# Altium PCB U_I_Meter_TOP.PcbDoc
Units mm, origin at the board's own origin, x right, y up, seen from the top; angles counter-clockwise.
Board outline 67 x 84 mm, 2 copper layers (Top Layer, Bottom Layer), stack 1.071 mm thick; 136 components, 56 nets, 327 pads, 62 vias.
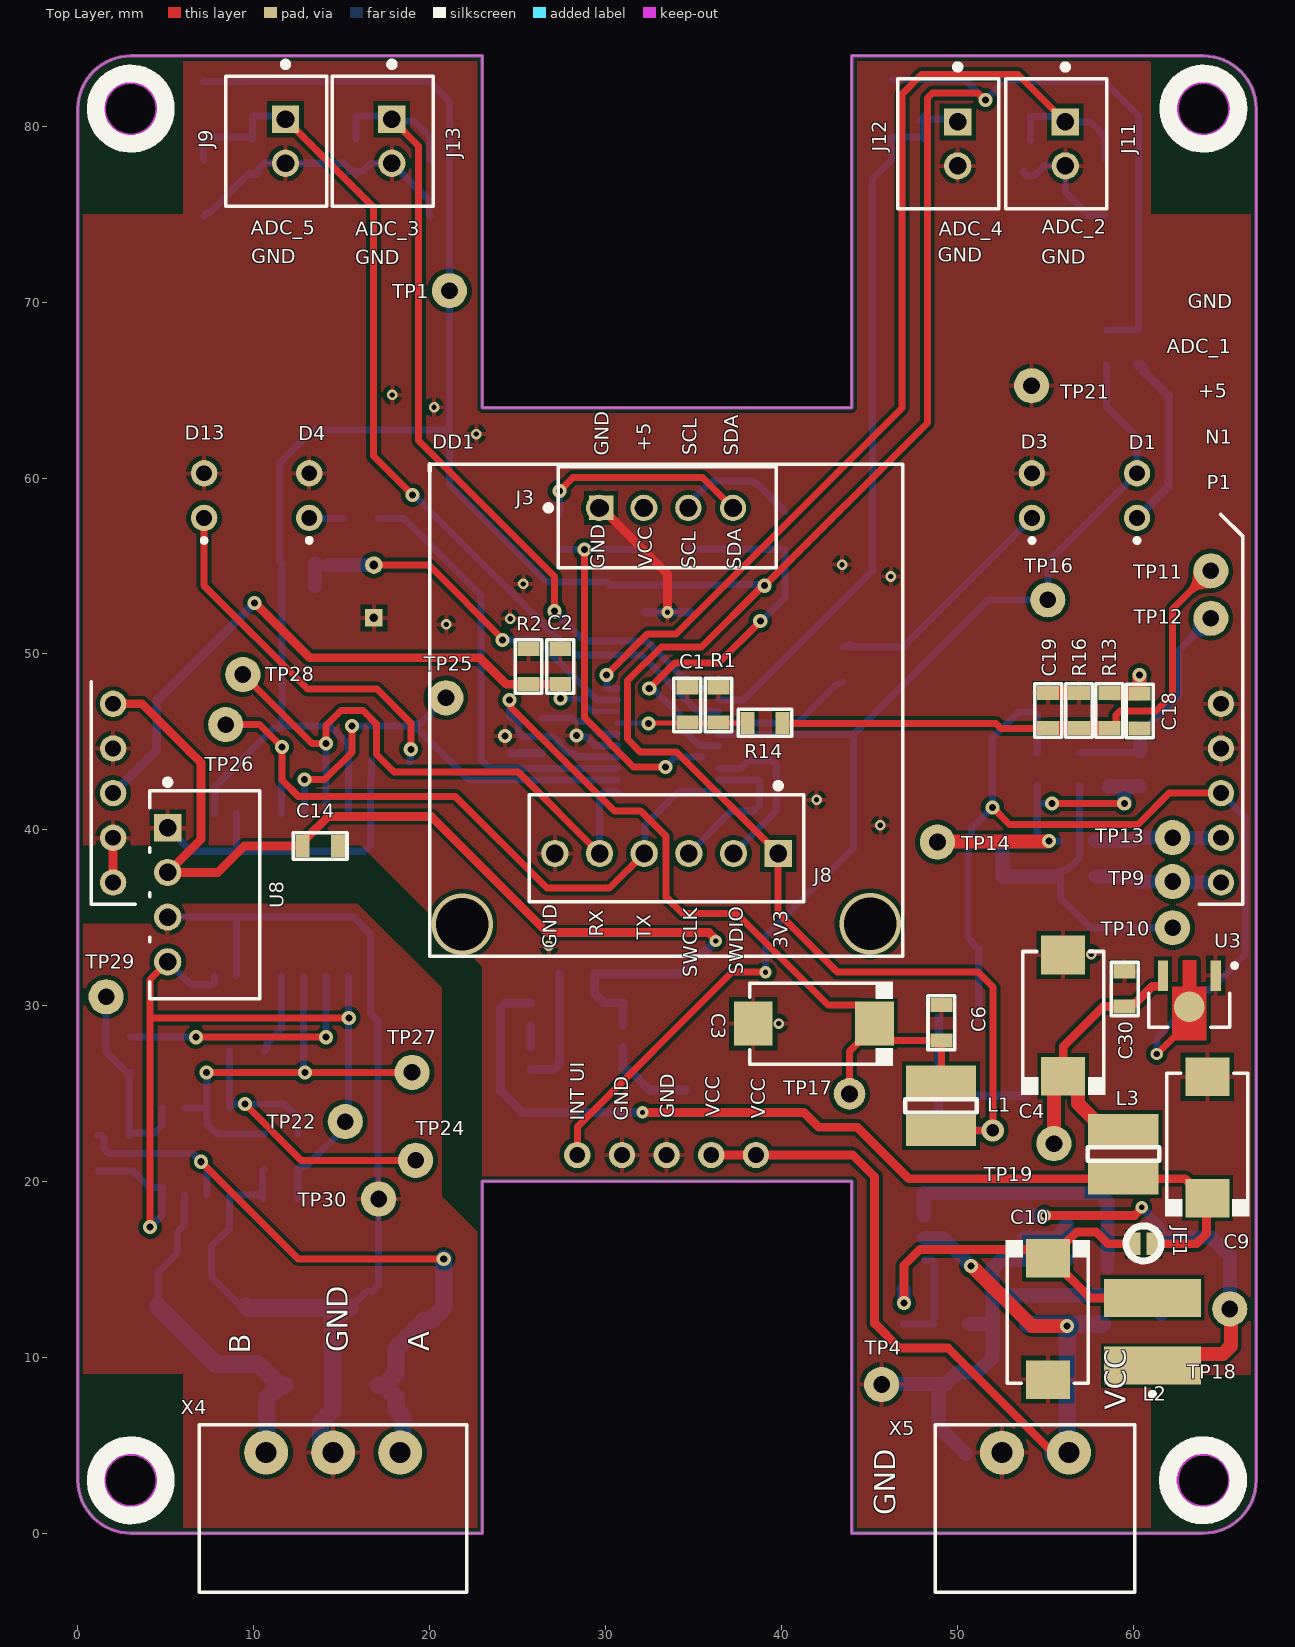
[diagram p0: Top Layer view]
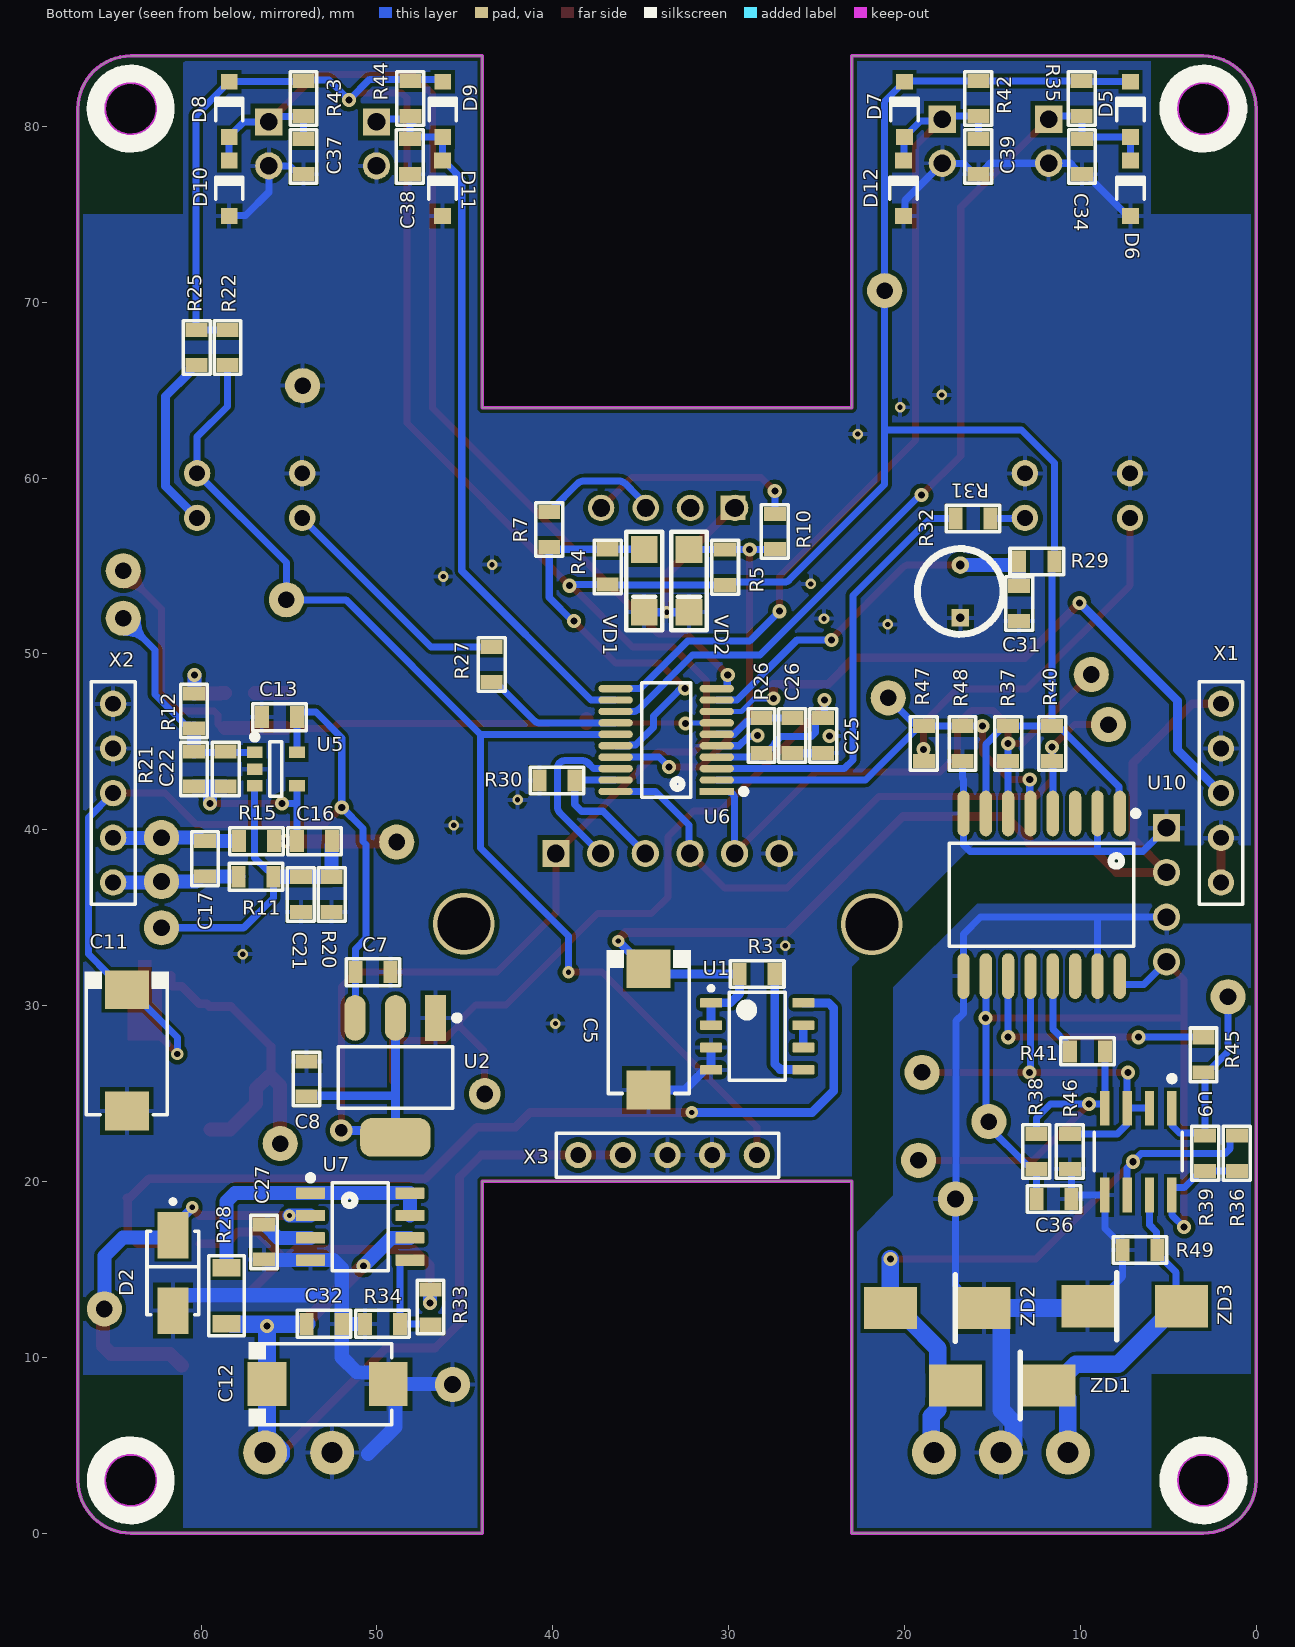
[diagram p1: Bottom Layer view, seen from below]
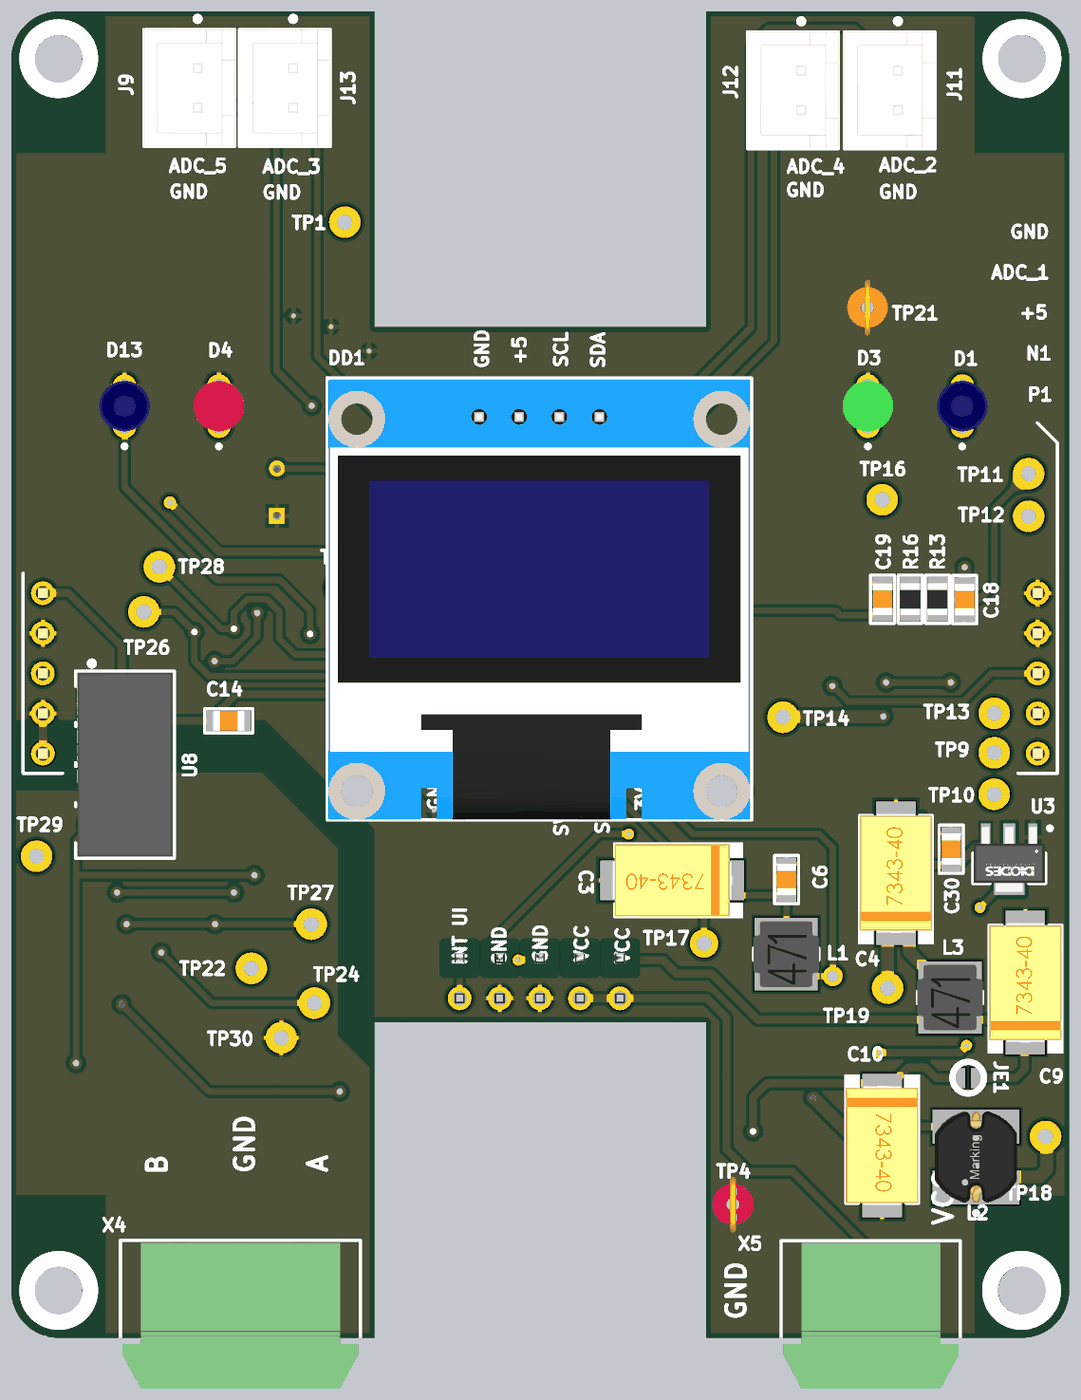
[diagram p2: 3D render of the assembled board from above, using the file's embedded part models]
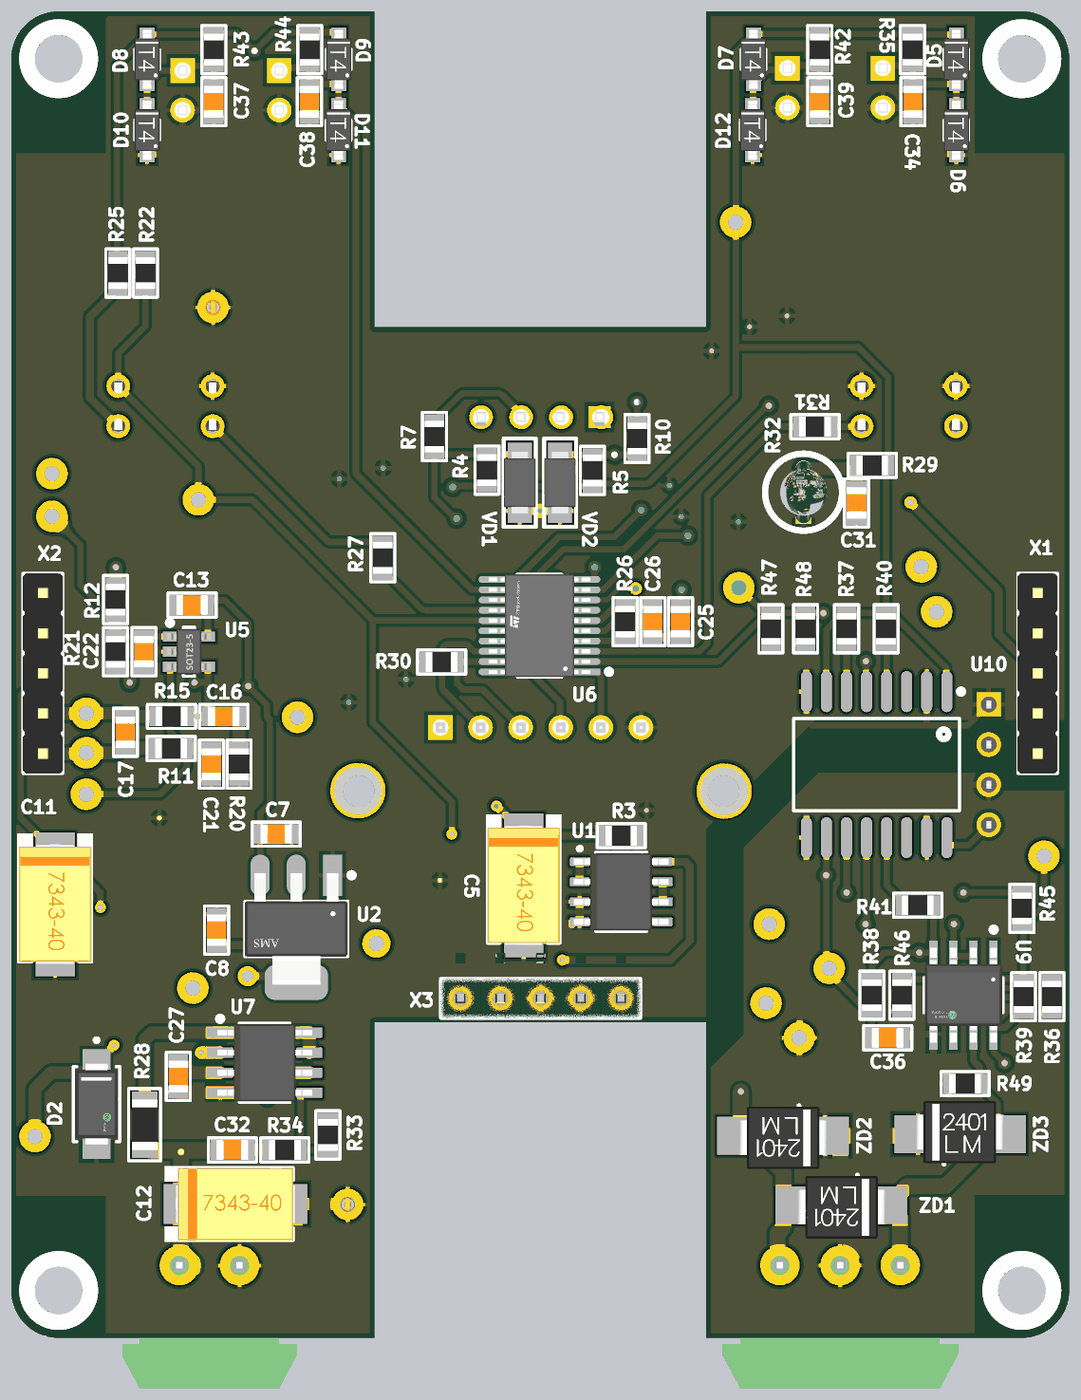
[diagram p3: 3D render of the assembled board from below, using the file's embedded part models]

## Layer stack, top to bottom
Top Solder: solder mask 0.0102, Solder Resist, Dk 3.5
Top Layer: signal copper 0.0356
Dielectric 1: dielectric 1, FR-4, Dk 4.8
Bottom Layer: signal copper 0.0356
Bottom Solder: solder mask 0.0102, Solder Resist, Dk 3.5

## Board outline
3,0 cw(c3,3) 0,3 0,81 cw(c3,81) 3,84 23,84 23,64 44,64 44,84 44.004,84 64,84 cw(c64,81) 67,81 67,3 cw(c64,3) 64,0 44,0 44,20 23,20 23,0
cut-out: 3,1.5 cw(c3,3) 1.5,3 cw(c3,3) 3,4.5 cw(c3,3) 4.5,3 cw(c3,3)
cut-out: 3,79.5 cw(c3,81) 1.5,81 cw(c3,81) 3,82.5 cw(c3,81) 4.5,81 cw(c3,81)
cut-out: 64,79.5 cw(c64,81) 62.5,81 cw(c64,81) 64,82.5 cw(c64,81) 65.5,81 cw(c64,81)
cut-out: 62.5,3 ccw(c64,3) 64,1.5 ccw(c64,3) 65.5,3 ccw(c64,3) 64,4.5 ccw(c64,3)

## Design rules (kind name [scope] priority, off if disabled: settings)
Clearance [All] p1: gap=0.2 ignorepadtopadclearanceinfootprint=FALSE except(0.254: THPad-THPad THPad-Via THPad-Fill THPad-Poly THPad-Region THPad-Text THPad-Hole Via-Via Via-Fill Via-Poly Via-Region Via-Text Via-Hole Fill-Fill Fill-Poly Fill-Region Fill-Text Fill-Hole Poly-Poly Poly-Region Poly-Text Poly-Hole Region-Region Region-Text Region-Hole Text-Text Text-Hole)
ComponentClearance [All] p1: gap=-1 collisioncheckmode=3 verticalgap=0 showdistances=FALSE
Height [All] p1: minheight=-1 maxheight=100 prefheight=12.7
PolygonConnect [All] p1: connectstyle=Relief reliefconductorwidth=0.254 reliefentries=4 polygonreliefangle="90 Angle" airgapwidth=0.254
RoutingVias [All] p1: holewidth=0.711 width=1.27 viastyle="Through Hole" minholewidth=0.711 minwidth=1.27 maxholewidth=0.711 maxwidth=1.27
SolderMaskExpansion [All] p1: expansion=0.102 istentingtop=FALSE
Width [All] p1: maxlimit=10 minlimit=0.254 preferedwidth=0.254 minimp=50.000000 maximp=50.000000 favimp=50.000000
28 further rules are at their usual default settings.

## Components (designator, comment, footprint, x,y, rotation, side; value= is the part's Value field where it differs from the comment)
C1 "1000pF" CAP-0805 34.65,47.1 r270 top
C2 "470nF" CAP-0805 27.425,49.275 r270 top
C3 "47uF_16V" CAP-TAN-D 41.85,28.975 r180 top
C4 "100uF_16V" CAP-TAN-D 56.025,29.425 r90 top
C5 "100uF_16V" CAP-TAN-D 34.55,28.65 r270 bottom
C6 "0.1uF" CAP-0805 49.1,29.025 r270 top
C7 "0.1uF" CAP-0805 50.225,31.9 r0 bottom
C8 "0.1uF" CAP-0805 54,25.825 r270 bottom
C9 "100uF_16V" CAP-TAN-D 64.225,22.5 r90 top
C10 "100uF_16V" CAP-TAN-D 55.15,12.175 r270 top
C11 "100uF_16V" CAP-TAN-D 64.225,27.45 r270 bottom
C12 "100uF_16V" CAP-TAN-D 52.8,8.475 r180 bottom locked
C13 "0.1uF" CAP-0805 55.55,46.4 r180 bottom
C14 "100nF" CAP-0805 13.775,39.075 r180 top
C16 "0.1uF" CAP-0805 53.55,39.35 r180 bottom
C17 "0.1uF" CAP-0805 59.775,38.35 r270 bottom
C18 "1000pF" CAP-0805 60.375,46.75 r90 top
C19 "1000pF" CAP-0805 55.175,46.775 r270 top
C21 "0.1uF" CAP-0805 54.325,36.325 r90 bottom
C22 "0.1uF" CAP-0805 58.6,43.45 r90 bottom
C25 "0.1uF" CAP-0805 24.625,45.35 r90 bottom
C26 "1uF" CAP-0805 26.375,45.35 r90 bottom
C27 "470pF" CAP-0805 56.425,16.55 r270 bottom
C30 "0.1uF" CAP-0805 59.525,30.95 r270 top
C31 "0.1uF" CAP-0805 13.475,52.875 r90 bottom
C32 "0.47uF" CAP-0805 53,11.9 r180 bottom
C34 "0.1uF" CAP-0805 9.9,78.275 r90 bottom
C36 "0.47uF" CAP-0805 11.5,19 r180 bottom
C37 "0.1uF" CAP-0805 54.175,78.275 r90 bottom
C38 "0.1uF" CAP-0805 48.125,78.275 r90 bottom
C39 "0.1uF" CAP-0805 15.8,78.275 r90 bottom
D1 "151031YS06000" LED_3mm_BLUE 60.225,59 r90 top
D2 "ES1G" FP-403AE-MFG 61.6,14.8 r270 bottom
D3 "151031YS06000" LED_3mm_GREEN 54.25,59 r90 top
D4 "151031YS06000" LED_3mm_RED 13.15,59 r90 top
D5 "1N4148" DIOD-SOD123-2_V 7.15,80.962 r90 bottom
D6 "1N4148" DIOD-SOD123-2_V 7.15,76.475 r90 bottom
D7 "1N4148" DIOD-SOD123-2_V 20,80.962 r90 bottom
D8 "1N4148" DIOD-SOD123-2_V 58.4,80.962 r90 bottom
D9 "1N4148" DIOD-SOD123-2_V 46.263,80.962 r90 bottom
D10 "1N4148" DIOD-SOD123-2_V 58.4,76.475 r90 bottom
D11 "1N4148" DIOD-SOD123-2_V 46.275,76.475 r90 bottom
D12 "1N4148" DIOD-SOD123-2_V 20.05,76.475 r90 bottom
D13 "LED" LED_3mm_BLUE 7.175,59 r90 top
DD1 "OLED_SSD_1306" OLED_128x64_SSD_1306 33.44,38.8 r0 top
J3 "B4B-XH-A(LF)(SN)" B4B-XH-A 33.5,57.775 r180 top locked
J8 "SWR25X-NRTC-S06-ST-BA" Sullins_SWR25X-NRTC-S06-ST-BA_MFG 33.47,38.95 r180 top locked
J9 "B2B-XH-A" B2B-XH-A 11.275,79.15 r270 top locked
J11 "B2B-XH-A" B2B-XH-A 55.625,79 r270 top locked
J12 "B2B-XH-A" B2B-XH-A 49.5,79 r270 top locked
J13 "B2B-XH-A" B2B-XH-A 17.325,79.15 r270 top locked
JE1 "Jumper" JE 60.6,16.475 r270 top
L1 "Coil" Coil_4.5x4.5_mm 49.075,24.3 r90 top
L2 "3.3µH, 4A" WE-PD2_5848 61.1,11.45 r90 top locked
L3 "Coil" Coil_4.5x4.5_mm 59.45,21.55 r90 top
R1 "10K" RES-0805 36.425,47.1 r90 top
R2 "43K" RES-0805 25.625,49.275 r270 top
R3 "300K" RES-0805 28.375,31.8 r180 bottom
R4 "10K" RES-0805 36.875,54.95 r270 bottom
R5 "10K" RES-0805 30.2,54.925 r270 bottom
R7 "10E" RES-0805 40.2,57.075 r90 bottom
R10 "10E" RES-0805 27.375,56.95 r90 bottom
R11 "10K" RES-0805 56.875,37.325 r180 bottom
R12 "10K" RES-0805 60.4,46.75 r270 bottom
R13 "10K" RES-0805 58.65,46.775 r90 top
R14 "10K" RES-0805 39.075,46.075 r0 top
R15 "10K" RES-0805 56.85,39.35 r180 bottom
R16 "100K*" RES-0805 56.925,46.775 r90 top
R20 "10K" RES-0805 52.575,36.325 r90 bottom
R21 "10K" RES-0805 60.4,43.45 r90 bottom
R22 "10K" RES-0805 58.5,67.425 r270 bottom
R25 "820" RES-0805 60.25,67.425 r90 bottom
R26 "10K" RES-0805 28.125,45.35 r90 bottom
R27 "220" RES-0805 43.475,49.4 r90 bottom
R28 "0.33" RES-1206 58.55,13.5 r90 bottom
R29 "10K" RES-0805 12.475,55.25 r0 bottom
R30 "10K" RES-0805 39.75,42.8 r0 bottom
R31 "220" RES-0805 16.1,57.7 r180 bottom
R32 "NTCLE413E2103F520L" FP-NTCLE413E2103F520L-MFG 16.825,53.55 r90 bottom
R33 "3.8K" RES-0805 46.95,12.85 r270 bottom
R34 "1.2K" RES-0805 49.675,11.9 r180 bottom
R35 "10K" RES-0805 9.925,81.575 r270 bottom
R36 "10K" RES-0805 1.1,21.6 r270 bottom
R37 "10K" RES-0805 14.1,44.9 r90 bottom
R38 "10K" RES-0805 12.5,21.7 r270 bottom
R39 "10K" RES-0805 2.9,21.6 r270 bottom
R40 "10K" RES-0805 11.6,44.9 r90 bottom
R41 "100" RES-0805 9.6,27.4 r0 bottom
R42 "10K" RES-0805 15.8,81.575 r270 bottom
R43 "10K" RES-0805 54.175,81.575 r270 bottom
R44 "10K" RES-0805 48.1,81.575 r270 bottom
R45 "100" RES-0805 3,27.2 r90 bottom
R46 "10K" RES-0805 10.6,21.7 r90 bottom
R47 "220" RES-0805 18.9,44.9 r90 bottom
R48 "10K" RES-0805 16.7,44.9 r90 bottom
R49 "10K" RES-0805 6.6,16.1 r180 bottom
TP1 "Test_Point_PCB" Test_Point#1 21.125,70.65 r270 top
TP4 "Test_Point_PCB" Pin_Test_Point(Pink) 45.7,8.45 r0 top
TP9 "Test_Point_PCB" Test_Point#2 62.375,37.05 r0 top
TP10 "Test_Point_PCB" Test_Point#3 62.375,34.425 r90 top
TP11 "Test_Point_PCB" Test_Point#4 64.325,54.725 r90 top
TP12 "Test_Point_PCB" Test_Point#1 64.425,52.025 r90 top
TP13 "Test_Point_PCB" Test_Point#1 62.25,39.55 r90 top
TP14 "Test_Point_PCB" Test_Point#1 48.875,39.3 r90 top
TP16 "Test_Point_PCB" Test_Point#1 55.15,53.075 r90 top
TP17 "" Test_Point#5 43.875,24.975 r90 top
TP18 "Test_Point_PCB" Test_Point#1 65.5,12.75 r90 top
TP19 "Test_Point_PCB" Test_Point#1 55.5,22.15 r90 top
TP21 "Test_Point_PCB" Pin_Test_Point(Orange) 54.225,65.25 r0 top
TP22 "Test_Point_PCB" Test_Point#1 15.2,23.4 r90 top
TP24 "Test_Point_PCB" Test_Point#1 19.2,21.2 r90 top
TP25 "Test_Point_PCB" Test_Point#1 20.925,47.5 r90 top
TP26 "Test_Point_PCB" Test_Point#1 8.4,45.975 r90 top
TP27 "Test_Point_PCB" Test_Point#1 19,26.2 r90 top
TP28 "Test_Point_PCB" Test_Point#1 9.375,48.825 r90 top
TP29 "" Test_Point#1 1.6,30.5 r90 top
TP30 "Test_Point_PCB" Test_Point#1 17.1,19 r90 top
U1 "LP2951-5.0" SOIC-8_L 28.375,28.25 r180 bottom
U2 "AMS1117-3.3" SOT-223 48.95,25.9 r0 bottom
U3 "AMS1117" SOT-89 63.2,29.925 r180 top
U5 "" SOT-23-5 55.75,43.45 r180 bottom
U6 "STM32G030F6P6" FP-TSSOP20-YA-IPC_A 33.55,45.1 r0 bottom locked
U7 "MC34063" SOIC-8_M 50.95,17.425 r180 bottom
U8 "B0505S-1W" B0505S-1W 7.2,36.3 r270 top
U9 "MAX485" SOIC-8-MFG 6.7,21.7 r270 bottom
U10 "ADUM1401BRWZ" ADI-RW-16_M 12.2,36.3 r270 bottom
VD1 "SMF3.3A" SMF3.3A 34.8,54.15 r0 bottom
VD2 "SMF3.3A" SMF3.3A 32.25,54.15 r0 bottom
X1 "CONN-5-PIN" CONN-PLS-5-2.54_2 2,37 r90 bottom locked
X2 "CONN-5-PIN" CONN-PLS-5-2.54_2 65,47.16 r270 bottom locked
X3 "CONN-5-PIN" CONN-PLS-5-2.54_2 28.395,21.5 r0 bottom locked
X4 "CONN-3-PIN" 691305340003 14.51,1.4 r0 top locked
X5 "CONN-2-PIN" 691305340002 54.45,1.4 r0 top locked
ZD1 "P6SMB16CA" DO-214AA 12.147,8.4 r0 bottom
ZD2 "P6SMB16CA" DO-214AA 15.847,12.8 r0 bottom
ZD3 "P6SMB16CA" DO-214AA 9.2,12.9 r180 bottom

## Footprints (in the part's own frame and the unit in brackets; to place one, negate y for a bottom-side part, rotate by r counter-clockwise, add the part's x,y. Pads: shape width x height; smd on the part's side, far side on the other; paste and mask are expansions set on the pad)
691305340002 [mm]
  round 2.5 hole 1.2: 1(-1.905,3.175) 2(1.905,3.183)
  silkscreen extent -5.7,-4.75 5.65,4.75, body extent -5.56,-4.6 5.56,4.6, height 7.3
691305340003 [mm]
  round 2.5 hole 1.2: 1(-3.81,3.183) 2(0,3.183) 3(3.81,3.183)
  silkscreen extent -7.6,-4.75 7.6,4.77, body extent -7.46,-4.6 7.46,4.6, height 7.3
ADI-RW-16_M [mm] "SOIC, 16-Leads, Body 10.3x7.5mm, Pitch 1.27mm, IPC Low Density"
  oval 2.6x0.7 smd: 1(-4.625,4.445) 2(-4.625,3.175) 3(-4.625,1.905) 4(-4.625,0.635) 5(-4.625,-0.635) 6(-4.625,-1.905) 7(-4.625,-3.175) 8(-4.625,-4.445) 9(4.625,-4.445) 10(4.625,-3.175) 11(4.625,-1.905) 12(4.625,-0.635) 13(4.625,0.635) 14(4.625,1.905) 15(4.625,3.175) 16(4.625,4.445)
  silkscreen extent -4.75,-5.25 2.93,5.47, body extent -3.8,-5.25 3.8,5.25, height 2.65
B2B-XH-A [mm]
  rect 1.55x1.55 hole 1 paste-2539.97 mask+0: 1(-1.25,0.525)
  round 1.55 hole 1 paste-2539.97 mask+0: 2(1.25,0.525)
  silkscreen extent -4.5,-2.88 3.7,2.88, body extent -3.8,-2.98 3.8,2.98, height 0.25
B4B-XH-A [mm]
  rect 1.4x1.4 hole 0.9 paste-2539.97 mask+0: 1(3.75,-0.525)
  round 1.4 hole 0.9 paste-2539.97 mask+0: 2(1.25,-0.525) 3(-1.25,-0.525) 4(-3.75,-0.525)
  silkscreen extent -6.2,-2.88 6.87,2.88, body extent -6.3,-2.98 6.3,2.98, height 0.25
B0505S-1W [mm]
  rect 1.55x1.55 hole 1 paste-2539.97 mask+0: 1(-3.81,-2.1)
  round 1.55 hole 1 paste-2539.97 mask+0: 2(-1.27,-2.1) 3(1.27,-2.1) 4(3.81,-2.1)
  silkscreen extent -6.52,-3.13 5.92,3.13, body extent -5.8,-3 5.8,3, height 10.41
CAP-0805 [mm]
  rect 0.8x1.25 smd mask+0.015: 1(-1,0) 2(1,0)
  silkscreen extent -1.52,-0.76 1.52,0.76, body extent -1,-0.62 1,0.63, height 0.8
CAP-TAN-D [mm]
  rect 2.2x2.5 smd: 1(-3.45,0) 2(3.45,0)
  silkscreen extent -4.5,-2.4 3.65,2.4, body extent -3.8,-2.3 3.8,2.3, height 4
Coil_4.5x4.5_mm [mm]
  rect 1.8x4 smd: 1(-1.397,0) 2(1.397,0)
  silkscreen extent -0.38,-2.03 0.38,2.03, body extent -2.07,-2.07 2.07,2.07, height 2.8
CONN-PLS-5-2.54_2 [mm]
  round 1.5 hole 0.9: 1(0,0) 2(2.54,0) 3(5.08,0) 4(7.62,0) 5(10.16,0)
  silkscreen extent -1.25,-1.25 11.41,1.25, body extent -1.27,-1.27 11.43,1.27, height 19.54
DIOD-SOD123-2_V [mm] "SOD123, 2-Leads, Body 2.7x1.55mm, Height 1.45mm"
  rect 0.9x0.95 smd: 1(1.575,0) 2(-1.575,0)
  silkscreen extent -0.64,-0.82 0.64,0.77, body extent -1.88,-0.8 1.88,0.8, height 1.3
DO-214AA [mm]
  rect 3x2.4 smd: 1(-0.381,0) 2(4.953,0)
  silkscreen extent 1.27,-1.91 1.27,1.91, body extent -0.53,-1.85 5.07,2.1, height 2.65
FP-403AE-MFG [mm]
  rect 2.65x1.75 smd paste+0 mask+0: 1(-2.15,0) 2(2.15,0)
  silkscreen extent -4.17,-1.48 2.37,1.48, body extent -2.6,-1.36 2.6,1.36, height 2.5
FP-NTCLE413E2103F520L-MFG [mm]
  rect 1x1 hole 0.5 paste-2539.97 mask+0: 1(-1.5,0)
  round 1 hole 0.5 paste-2539.97 mask+0: 2(1.5,0)
  silkscreen extent -2.44,-2.43 2.44,2.44, body extent -2,-1.49 2,1.49, height 55
FP-TSSOP20-YA-IPC_A [mm]
  rect 1.955x0.421 smd paste+0 mask+0: 1(-2.875,2.925)
  rrect100% 1.955x0.421 smd paste+0 mask+0: 2(-2.875,2.275) 3(-2.875,1.625) 4(-2.875,0.975) 5(-2.875,0.325) 6(-2.875,-0.325) 7(-2.875,-0.975) 8(-2.875,-1.625) 9(-2.875,-2.275) 10(-2.875,-2.925) 11(2.875,-2.925) 12(2.875,-2.275) 13(2.875,-1.625) 14(2.875,-0.975) 15(2.875,-0.325) 16(2.875,0.325) 17(2.875,0.975) 18(2.875,1.625) 19(2.875,2.275) 20(2.875,2.925)
  silkscreen extent -4.53,-3.25 1.4,3.25, body extent -3.21,-3.25 3.21,3.25, height 1.2
JE [mil]
  rect 50x27.56 smd: 1(1,20) 2(1,-21)
  silkscreen extent -39,-39 39,39
LED_3mm_BLUE [mm]
  round 1.5 hole 0.9: 1(-1.27,0) 2(1.27,0)
  silkscreen extent -2.6,-0.05 -2.5,0.05, body extent -1.6,-1.6 1.6,1.6, height 12.45
LED_3mm_GREEN [mm]
  round 1.5 hole 0.9: 1(-1.27,0) 2(1.27,0)
  silkscreen extent -2.6,-0.05 -2.5,0.05, body extent -1.6,-1.6 1.6,1.6, height 12.45
LED_3mm_RED [mm]
  round 1.5 hole 0.9: 1(-1.27,0) 2(1.27,0)
  silkscreen extent -2.6,-0.05 -2.5,0.05, body extent -1.6,-1.6 1.6,1.6, height 12.45
OLED_128x64_SSD_1306 [mm]
  round 1.5 hole 1: 1(-3.81,19.5) 2(-1.27,19.5) 3(1.27,19.5) 4(3.81,19.5)
  silkscreen extent -13.42,-6 13.45,21.98, body extent -13.35,-5.99 13.35,21.88, height 14.97
Pin_Test_Point(Orange) [mm]
  round 2 hole 0.95: 1(0,0)
  body extent -1.3,-1.78 1.3,1.78, height 6.93
Pin_Test_Point(Pink) [mm]
  round 2 hole 0.95: 1(0,0)
  body extent -1.3,-1.78 1.3,1.78, height 6.93
RES-0805 [mm]
  rect 0.8x1.25 smd mask+0.015: 1(-1,0) 2(1,0)
  silkscreen extent -1.52,-0.76 1.52,0.76, body extent -1,-0.62 1,0.63, height 0.6
RES-1206 [mm]
  rect 1x1.6 smd: 1(-1.6,0) 2(1.6,0)
  silkscreen extent -2.29,-1.02 2.29,1.02, body extent -1.6,-0.8 1.6,0.8, height 0.6
SMF3.3A [mil]
  rect 60x60 smd: 1(0,70) 2(0,-70)
  silkscreen extent -40,-110 40,110, body extent -39,-77 39,77, height 48
SOIC-8-MFG [mm]
  rect 1.98x0.53 smd paste+0 mask+0: 1(-2.465,1.905) 2(-2.465,0.635) 3(-2.465,-0.635) 4(-2.465,-1.905) 5(2.465,-1.905) 6(2.465,-0.635) 7(2.465,0.635) 8(2.465,1.905)
  silkscreen extent -4.27,-2.5 1.1,2.5, body extent -3,-2.45 3,2.45, height 1.75
SOIC-8_L [mm]
  rrect18% 1.25x0.55 smd: 1(-2.625,1.905) 2(-2.625,0.635) 3(-2.625,-0.635) 4(-2.625,-1.905) 5(2.625,-1.905) 6(2.625,-0.635) 7(2.625,0.635) 8(2.625,1.905)
  silkscreen extent -2.75,-2.5 1.6,2.85, body extent -3,-2.45 3,2.45, height 1.63
SOIC-8_M [mm]
  rrect15% 1.65x0.65 smd: 1(-2.825,1.905) 2(-2.825,0.635) 3(-2.825,-0.635) 4(-2.825,-1.905) 5(2.825,-1.905) 6(2.825,-0.635) 7(2.825,0.635) 8(2.825,1.905)
  silkscreen extent -2.95,-2.5 1.6,2.9, body extent -3,-2.45 3,2.45, height 1.63
SOT-23-5 [mm]
  rect 0.9x0.65 smd: 1(-1.2,0.95) 2(-1.2,0) 3(-1.2,-0.95) 4(1.2,-0.95) 5(1.2,0.95)
  silkscreen extent -1.33,-1.55 0.35,1.95, body extent -1.4,-1.45 1.4,1.45, height 1.24
SOT-89 [mm]
  rect 0.58x1.73 smd paste+0 mask+0: 1(-1.5,-1.781) 3(1.5,-1.781)
  round 1.74 smd paste+0 mask+0: 2(0,0)
  Top Layer region: -0.38,-2.646 -0.38,-1.146 -0.967,-1.146 -0.967,1.884 0.967,1.884 0.967,-1.146 0.38,-1.146 0.38,-2.646
  silkscreen extent -2.7,-2.47 2.3,1.15, body extent -2.4,-2.75 2.4,1.98, height 0.25
SOT-223 [mm]
  rect 1.2x2.6 smd paste+0 mask+0: 1(-2.29,-3.395)
  rrect100% 1.2x2.6 smd paste+0 mask+0: 2(0,-3.395) 3(2.29,-3.395)
  rrect59% 4x2.2 smd paste+0 mask+0: 2(0,3.395)
  silkscreen extent -3.62,-3.52 3.25,1.75, body extent -3.25,-3.53 3.25,3.53, height 1.8
Sullins_SWR25X-NRTC-S06-ST-BA_MFG [mm]
  rect 1.55x1.55 hole 1 paste-2539.97 mask+0: 1(-6.35,0.3)
  round 1.55 hole 1 paste-2539.97 mask+0: 2(-3.81,0.3) 3(-1.27,0.3) 4(1.27,0.3) 5(3.81,0.3) 6(6.35,0.3)
  silkscreen extent -7.8,-3.67 7.8,3.05, body extent -7.9,-3.15 7.9,3.15, height 0.25
Test_Point#1 [mm]
  round 2 hole 0.95: 1(0,0)
Test_Point#2 [mm]
  round 2 hole 0.95: 1(-0.125,0)
Test_Point#3 [mm]
  round 2 hole 0.95: 1(0,0.125)
Test_Point#4 [mm]
  round 2 hole 0.95: 1(0,-0.1)
Test_Point#5 [mm]
  round 1.8 hole 0.95: 1(0,0)
WE-PD2_5848 [mm] "SMD Power Inductor, 2-Leads, body 5.8x5.2mm"
  rect 2.15x5.5 smd: 1(-1.925,0) 2(1.925,0)
  silkscreen extent -3.67,-0.13 -3.43,0.12, body extent -2.9,-2.6 2.89,2.6, height 4.48

## Part data
C1 C2 C6 C7 C8 C13 C14 C16 C17 C18 C19 C21 C22 C25 C26 C27 C30 C31 C32 C34 C36 C37 C38 C39: library part CAP-NON-POLAR
C3: library part CAP-POLAR
C4 C5 C9 C10 C11 C12: library part CAP_POL_SMD
D1 D3 D4: library part LED, "WURTH ELEKTRONIK - 151031YS06000 - LED, Yellow, Through Hole, T-1 (3mm), 30 mA, 2 V, 590 nm", Manufacturer_Name="Wurth Elektronik", Mouser Part Number=710-151031YS06000, Datasheet Link=https://katalog.we-online.de/led/datasheet/151031YS06000.pdf, Geometry.Height=5.5mm, Manufacturer_Part_Number=151031YS06000, Mouser Price/Stock=https://www.mouser.co.uk/ProductDetail/Wurth-Elektronik/151031YS06000?qs=LlUlMxKIyB3xSYYW%252BcuBiQ%3D%3D
D2: "Ultrafast"
D13: "WURTH ELEKTRONIK - 151031YS06000 - LED, Yellow, Through Hole, T-1 (3mm), 30 mA, 2 V, 590 nm", Manufacturer_Name="Wurth Elektronik", Manufacturer_Part_Number=151031YS06000, Mouser Part Number=710-151031YS06000, Datasheet Link=https://katalog.we-online.de/led/datasheet/151031YS06000.pdf, Geometry.Height=5.5mm, Mouser Price/Stock=https://www.mouser.co.uk/ProductDetail/Wurth-Elektronik/151031YS06000?qs=LlUlMxKIyB3xSYYW%252BcuBiQ%3D%3D
JE1: library part JE
L2: library part 744774033, "WE-PD2 SMT Power Inductor, size 5848, 3.3µH, 4A, 0.06Ω", Case/Size Code=5848, DC Resistance=0.042Ω, DC Resistance Max=0.06Ω, Inductance=3.3µH, Manufacturer="Wurth Elektronik", Operating Temperature Max=125°C, Operating Temperature Min=-40°C, Rated Current=4A, Saturation Current=7.5A, Self Resonant Frequency=43MHz, Category="Unshielded Power Inductors", ComponentLink1Description="Website Link", ComponentLink1URL=https://www.we-online.com/redexpert/article/744774033?ad, ComponentLink2Description="Datasheet Link", ComponentLink2URL=https://www.we-online.com/redexpert/spec/744774033?ad, Height=4.5mm, Length=5.8mm, Manufacturer Part Number=744774033, Match Code=WE-PD2, Mount="Surface Mount", Packaging="Tape and Reel", Width=5.2mm, Simulation ModelName=5848_744774033_3.3u, Simulation ModelText=".subckt 5848_744774033_3.3u 1 2 / Rp 1 2 12000 / Cp 1 2 3.4p / Rs 1 N3 0.042 / L1 N3 2 3.3u / .ends 5848_744774033_3.3u", Simulation PortMap=(1:1),(2:2)
R1 R2 R3 R4 R5 R7 R10 R11 R12 R13 R14 R15 R16 R20 R21 R22 R26 R27 R28 R29 R30 R31 R34 R35 R36 R37 R38 R39 R40 R41 R42 R43 R44 R45 R46 R47 R48 R49: library part RES-CONST
R25: library part RES-CONST, "220"
R32: library part CMP-02404-000010-1, "THERMISTOR NTC 10KOHM 3435K BEAD", Max Operating Temperature=105°C, Max Power Dissipation=250mW, Min Operating Temperature=-40°C, Package Quantity=1000, Resistance=10kR, Resistance Tolerance=1%, Accuracy=1%, Lead Diameter=1mm, Mount="Through Hole", Number of Pins=2, Packaging=Bulk, Radiation Hardening=No, RoHS Compliant=Yes, Termination="Through Hole", Tolerance=1%
R33: library part RES-CONST, "10K"
TP1 TP4 TP9 TP10 TP11 TP12 TP13 TP14 TP16 TP17 TP18 TP19 TP21 TP22 TP24 TP25 TP26 TP27 TP28 TP29 TP30: library part TP_PCB?, "Test_Point"
U1: library part LP2951-3.3
U2: library part AMS1117
U5: library part MCP6001T, "IC OPAMP GP 1 CIRCUIT SOT23-5", Case/Package=SOT-23, Input Bias Current=1pA, Input Offset Voltage (Vos)=4.5mV, Max Operating Temperature=85°C, Max Supply Voltage=6V, Min Operating Temperature=-40°C, Min Supply Voltage=1.8V, Nominal Supply Current=100uA, Operating Supply Voltage=5.5V, Output Current=23mA, Package Quantity=1, Power Supply Rejection Ratio (PSRR)=86dB, Voltage Gain=112dB, Bandwidth=1MHz, Common Mode Rejection Ratio=60dB, Contact Plating=Tin, Gain Bandwidth Product=1MHz, Height=1.3mm, Lead Free="Lead Free", Length=3.1mm, Mount="Surface Mount", Number of Amplifiers=1, Number of Channels=1, Number of Circuits=1, Number of Elements=1, Number of Pins=5, Operating Supply Current=100uA, Output Current per Channel=23mA, Packaging="Tape and Reel", Radiation Hardening=No, REACH SVHC="No SVHC", Slew Rate=0.6V/µs, Unity Gain Bandwidth Product=1MHz, Voltage=6V, Width=1.8mm
U6: "SOIC-20"
U10: library part CMP-0534-00565-1, "Quad Channel Digital Isolator, 2.5 KV rms Insulation Rating, 10 Mbps Data Rate, 50 ns Delay, Industrial, 16-pin SOIC (RW-16), Tube", Manufacturer="Analog Devices", Max Operating Temp (degreesC)=125, Code_JEDEC=MS-013-AA, ComponentLink1Description="Manufacturer URL", ComponentLink1URL=http://www.analog.com/en/index.html, ComponentLink2Description=Datasheet, ComponentLink2URL=http://www.analog.com/static/imported-files/data_sheets/ADuM1400_1401_1402.pdf, ComponentLink3Description="Package Specification", ComponentLink3URL=http://www.analog.com/static/imported-files/packages/PKG_PDF/SOIC_WIDE%20%28RW%29/RW_16.pdf, ComponentLink4Description="URL Link1", ComponentLink4URL="Product URL:http://www.analog.com/en/interface-isolation/digital-isolators/adum1401/products/product.html", ComponentLink5Description="URL Link2", ComponentLink5URL="Reference Circuit:http://www.analog.com/en/interface-isolation/digital-isolators/adum1401/products/product.html#product-recommendations", DatasheetVersion="Rev. H", Max Data Rate=10Mbps, Mounting Technology="Surface Mount", PackageDescription="16-Pin Standard Small Outline Package, Body 10.3 x 7.5 mm, Pitch 1.27 mm", PackageReference=RW-16, PackageVersion="032707-B, 03/2007", PartNumber=ADUM1401BRWZ
VD1 VD2: library part ESD_Unidirect

## Via types
v1: diameter 0.8, hole 0.4, Top Layer to Bottom Layer, tented both sides, 36 vias
v2: diameter 0.6, hole 0.3, Top Layer to Bottom Layer, tented both sides, 13 vias
v3: diameter 0.7, hole 0.3, Top Layer to Bottom Layer, 6 vias
v4: diameter 0.8, hole 0.4, Top Layer to Bottom Layer, 3 vias
v5: diameter 3.5, hole 3, Top Layer to Bottom Layer, 2 vias
v6: diameter 1.27, hole 0.711, Top Layer to Bottom Layer, 1 vias
v7: diameter 0.7, hole 0.36, Top Layer to Bottom Layer, 1 vias

## Nets (pads, with @x,y where several pads share a name; then routed paths per layer and width w, separated by ;. In a path a pad name is that pad's centre, name@x,y a point inside that pad or via, vN(x,y) a via of type N, cw(c..) or ccw(c..) an arc to the next point about the centre after c; other vN are vias at no path point)
+3V3: C8.2 D5.1 D7.1 D8.1 D9.1 J8.1 L1.1 R4.2 R5.2 R22.1 R25.2 R29.1 R35.1 R37.2 R40.2 R42.1 R43.1 R44.1 TP1.1 U2.2 U10.1 U10.7 | length 230
  Top Layer w0.4: L1.1 49.078,22.9 v6(52.025,22.9) 52.025,31.05 51.175,31.9 43.175,31.9 39.82,35.255 J8.1 34.045,44.425 31.975,44.425 31.25,45.15 31.25,48.475 33.175,50.4 35.467,50.4 38.942,53.875 v1(39.05,53.875) 48.3,63.125 48.3,81.6 48.6,81.9 51.164,81.9 51.566,81.498 v1(51.598,81.498)
  Bottom Layer w0.4: D5.1 9.887,82.537 R35.1 R42.1 19.962,82.575 D7.1 20.025,82.537 20.225,82.337 20.225,82.312 21.125,81.412 TP1.1 21.125,62.725 ; U10.1 7.793,40.963 7.793,42.443 11.1,45.75 11.45,45.75 R40.2 ; U10.7 15.375,44.85 14.475,45.75 14.325,45.9 R37.2 R40.2 ; v1(39.05,53.875) 38.969,53.875 38.894,53.95 R4.2 36.85,53.925 R5.2 30.05,54.075 26.882,54.075 cw(c26.882,54.575) 26.529,54.221 21.125,59.625 21.125,62.725 ; D9.1@46.325,82.675 50.422,82.675 v1(51.598,81.498) 52.725,82.625 54.1,82.625 54.175,82.55 58.375,82.55 58.638,82.287 60.3,80.625 R25.2@60.3,68.425 ; R22.1 R25.2 ; R40.2 11.6,55.125 R29.1 11.475,60.85 13.35,62.725 21.125,62.725
  Bottom Layer w0.5: U2.2@48.95,29.295 48.95,24.725 ; v6(52.025,22.9) 49.345,22.9 48.95,22.505 48.95,24.725 ; C8.2@53.975,24.875 49.1,24.875 48.95,24.725
+3V3_MCU: C3.1 C6.2 C25.2 L1.2 R26.1 TP17.1 U6.4 | length 50.2
  Top Layer w0.4: v1(24.55,47.375) 24.627,47.298 24.627,46.948 30.5,41.075 32,41.075 33.45,39.625 33.45,36.159 34.384,35.225 37.45,35.225 42.65,30.025 44.4,30.025 45.3,29.125 C3.1 C3.1@45.3,28.925 ; TP17.1 43.875,27.4 45.3,28.825 C3.1@45.3,28.925 ; L1.2 49.1,25.722 C6.2 46.2,28.025 C3.1@45.3,28.925
  Bottom Layer w0.4: v1(24.55,47.375) 24.55,46.425 C25.2 24.85,46.35 25.05,46.15 25.05,45.534 25.284,45.3 27.016,45.3 27.4,44.916 27.4,44.85 27.9,44.35 R26.1 28.325,44.15 28.759,44.15 28.784,44.125 U6.4
+5: C7.2 C11.1 C13.2 U2.3 U3.2 U5.5 X2.3 | length 57.5
  Top Layer w0.4: v1(52,41.275) 52.975,40.3 60.275,40.3 62.055,42.08 X2.3 ; v7(61.35,27.25) 62.973,28.873 62.973,29.698 U3.2
  Bottom Layer w0.4: U2.3 51.225,29.31 C7.2 51.225,33.225 50.625,33.825 50.625,39.15 50.8,39.325 50.8,40.075 v1(52,41.275) 52,45.225 53.475,46.7 54.4,46.7 54.55,46.55 C13.2 U5.5 U5.5@54.475,44.325 ; v7(61.35,27.25) 61.35,28.175 64.075,30.9 64.375,30.9 65.275,31.8 66.4,32.925 66.4,40.68 X2.3
+5V_1: C5.1 C14.2 R3.1 U1.1 U1.2 U8.2 X1.5 | length 60.9
  Top Layer w0.5: X1.5 3.64,47.16 6.35,44.45 7,43.8 7,39.47 U8.2 7.945,37.57 9.45,39.075 C14.2 12.925,39.225 12.925,39.45 14.225,40.75 20.1,40.75 26.7,34.15 35.882,34.15 36.175,33.857 36.175,33.829 36.275,33.729 v3(36.275,33.675)
  Bottom Layer w0.5: U1.2 U1.1 29.895,30.155 29.375,30.675 R3.1 34.25,31.8 35.4,32.95 35.55,32.95 v3(36.275,33.675)
+5V_ISO: C36.1 R36.2 R38.2 R39.2 TP22.1 U8.4 U9.8 U10.10 U10.16 | length 51
  Top Layer w0.4: v1(4.1,17.398) 4.1,29.3 ; U8.4 4.1,31.49 4.1,29.3 ; v1(15.4,29.3) 4.1,29.3
  Bottom Layer w0.4: R36.2 R39.2 3.125,20.6 4.073,19.652 4.78,19.652 4.795,19.637 U9.8 4.78,19.22 4.78,18.078 v1(4.1,17.398) ; U8.4 6.39,31.2 7.663,31.2 7.755,31.292 U10.16 ; C36.1 R38.2 12.65,20.85 12.95,20.85 TP22.1@15.375,23.275 ; TP22.1 15.375,23.575 U10.10
+5V_WiFi: J3.2
GND_2: C36.2 R46.1 R49.1 TP30.1 U8.3 U9.5 U10.9 U10.15 X4.2 ZD2.1 ZD3.1 | length 63.3
  Bottom Layer w0.4: U8.3 9.025,35.03 ; U10.15 9.025,35.03 ; ZD3.1 9.281,12.9 7.6,14.581 R49.1 7.6,16.325 8.605,17.33 U9.5 10.35,19.235 C36.2@10.5,19.085 ; C36.2 C36.2@10.5,19.085 ; R46.1 10.5,20.6 C36.2@10.5,19.085 ; ZD2.1 16.416,13.75 16.75,13.75 17.1,14.1 TP30.1 ; TP30.1@17.066,19 17.066,29.134 16.645,29.555 U10.9 16.645,34.055 15.67,35.03 9.025,35.03
  Bottom Layer w1: ZD3.1 9.681,12.8 ZD2.1@15.2,12.8 ; X4.2@13.802,5.085 13.802,6.302 14.5,7 14.5,12.1 ZD2.1@15.2,12.8 ; ZD2.1 ZD2.1@15.2,12.8
GND_III: C1.1 C2.1 C3.2 C4.2 C5.2 C6.1 C7.1 C8.1 C9.2 C10.2 C11.2 C12.2 C13.1 C14.1 C18.1 C19.1 C21.1 C25.1 C26.1 C27.2 C30.1 C31.1 C32.2 C34.1 C37.1 C38.1 C39.1 D2.2 D3.2 D4.2 D6.2 D10.2 D11.2 D12.2 D13.2 J3.1 J8.6 J9.2 J11.2 J12.2 J13.2 R1.2 R2.1 R16.2 R20.1 R30.2 R32.1 R34.1 R48.1 TP4.1 TP21.1 U1.3 U1.4 U2.1 U3.1 U5.2 U6.5 U7.4 U8.1 U10.2 U10.8 VD1.1 VD2.1 X1.1 X1.2 X1.4 X2.1 X2.2 X3.2 X3.3 X5.1 | length 99.4
  Top Layer w0.5: X1.1 X1.2 ; J3.1 33.525,54.525 v3(33.525,52.372)
  Top Layer w0.8: C19.1 R16.2
  Bottom Layer w0.4: U8.1 6.435,38.775 9.025,38.775 ; D6.2 7.35,75.1 7.5,75.1 9.675,77.275 C34.1 10.125,77.275 10.275,77.425 10.275,77.607 10.568,77.9 J9.2 15.132,77.9 15.425,77.607 15.425,77.425 C39.1@15.65,77.425 ; U10.2 9.025,38.775 ; C39.1 C39.1@15.65,77.425 ; C39.1@15.8,77.425 C39.1@15.65,77.425 ; R48.1 16.7,42.9 16.645,42.845 16.645,39.145 16.275,38.775 9.025,38.775 ; D12.2 19.957,74.993 19.957,75.793 J13.2 17.825,77.875 16.626,77.875 16.175,77.425 15.81,77.446 15.618,77.457 C39.1@15.65,77.425 ; v1(28.35,45.35) 28.388,45.312 28.863,45.312 29.4,44.775 U6.5 ; C37.1@53.8,77.457 53.8,77.35 53.95,77.2 54.4,77.2 54.95,77.75 J11.2 56.15,76.25 57.468,74.932 58.368,74.932 D10.2
  Bottom Layer w0.5: C25.1 C26.1 ; U1.3 U1.4 31.35,26.345 32.495,25.2 C5.2 ; VD2.1 v3(33.525,52.372) VD1.1
  Bottom Layer w0.8: TP4.1 45.725,8.475 C12.2 50.011,9.136 51.136,9.136 52,10 C32.2 ; C12.2@48.95,8.075 48.95,6.05 50.5,4.5 ; R34.1 C32.2 ; C27.2@56.25,15.525 53.78,15.525 U7.4 52.47,15.52 52,15.05 52,13.525 ; D2.2@61.6,12.475 61.6,13.075 61.15,13.525 52,13.525 ; C32.2 52,13.525
  other v1: 24.275,45.325
  other v2: 39.85,28.975 57.625,32.925 26.775,33.4 45.625,40.25 42,41.7 20.95,51.675 24.575,52 25.325,53.975 46.225,54.4 43.45,55.075 22.65,62.5 20.25,64.025 17.875,64.725
NetC1_2: C1.2 R1.1 R14.1 U6.7 | length 7.7
  Top Layer w0.3: v4(32.45,46.05) 32.475,46.075 R14.1@38.05,46.075 ; R14.1@38.05,46.1 R14.1
  Top Layer w0.8: R14.1 R14.1@38.075,46.3
  Bottom Layer w0.3: U6.7 32.425,46.075 v4(32.45,46.05)
NetC2_2: C2.2 R2.2 U6.8 X1.3 | length 37.8
  Top Layer w0.5: v4(10.05,52.9) 13.175,49.775 22.85,49.775 24.35,48.275 C2.2 27.45,48.25 v4(27.45,47.45)
  Bottom Layer w0.3: v4(27.45,47.45) 28.55,47.45 29.275,46.725 U6.8
  Bottom Layer w0.5: X1.3 4.475,44.555 4.475,47.325 v4(10.05,52.9)
NetC4_1: C4.1 C30.2 L3.2 TP19.1 U3.3 | length 18.8
  Top Layer w0.5: C4.1 56.025,27.675 58.3,29.95 C30.2 59.675,30.1 60.094,30.1 61.092,31.098 61.66,31.098 61.7,31.138 U3.3
  Top Layer w0.8: TP19.1@55.726,22.15 TP19.1 55.5,25.45 C4.1 56.175,25.975 56.875,25.275 56.875,24.422 58.35,22.947 L3.2
NetC9_1: C9.1 JE1.1 L3.1 U1.8 | length 54.6
  Top Layer w0.5: v3(32.1,23.925) 41.275,23.925 42.125,23.075 44.325,23.075 47.247,20.153 L3.1 62.972,20.153 64.075,19.05 C9.1@64.175,19.05 ; JE1.1 63.6,16.45 64.175,17.025 C9.1@64.175,19.05 ; C9.1 C9.1@64.175,19.05
  Bottom Layer w0.5: U1.8 25.745,30.15 24.318,30.15 24.025,29.857 24.025,25.15 25.25,23.925 v3(32.1,23.925)
NetC10_1: C10.1 JE1.2 L2.2 R33.1 | length 24.5
  Top Layer w0.5: v1(46.975,13.075) 46.975,15.225 47.875,16.125 54.65,16.125 C10.1 C10.1@55.3,15.625 ; JE1.2 58.575,16.45 57.9,17.125 56.8,17.125 56.15,16.475 C10.1@55.3,15.625 ; L2.2 57.55,13.375 C10.1@55.3,15.625
  Bottom Layer w0.4: R33.1@46.725,13.85 R33.1
  Bottom Layer w0.8: R33.1 46.975,13.85 v1(46.975,13.075)
NetC16_1: C16.1 C22.1 R15.2 R21.1 TP14.1 U5.4 | length 18.5
  Top Layer w0.4: v1(55.4,41.5) v1(59.5,41.5)
  Top Layer w0.8: TP14.1@48.875,39.325 v1@55.2,39.325
  Bottom Layer w0.4: U5.4 54.55,41.5 ; v1(55.4,41.5) 54.55,41.5 ; R15.2 v1(55.225,39.35) C16.1 54.55,41.5
  Bottom Layer w0.8: C22.1 59.5,42.45 ; v1(59.5,41.5) 59.5,42.45 ; R21.1 59.5,42.45
NetC16_2: C16.2 C21.2 R11.2 R20.2 TP10.1 U5.3 | length 19.4
  Bottom Layer w0.4: 55.45,37.325 R11.2@55.775,37.65 ; U5.3 56.95,38.4 56.25,37.7 56.025,37.7 55.875,37.55 55.875,36.125 57.575,34.425 TP10.1
  Bottom Layer w0.8: C16.2 52.55,39.125 52.575,39.1 R20.2 C21.2 55.45,37.325
NetC17_1: C17.1 R15.1 TP13.1 X2.4 | length 7.2
  Bottom Layer w0.8: R15.1 C17.1 60,39.35 60.2,39.55 TP13.1 62.26,39.54 X2.4
NetC17_2: C17.2 R11.1 TP9.1 X2.5 | length 7.3
  Bottom Layer w0.8: R11.1 57.875,37.35 C17.2 60,37.35 60.3,37.05 62.375,37.05 62.425,37 X2.5
NetC18_2: C18.2 R12.1 R13.2 | length 3.9
  Top Layer w0.8: R13.2 58.875,47.775 58.9,47.75 C18.2 v1(60.375,48.8)
  Bottom Layer w0.8: v1(60.375,48.8) 60.375,47.75 R12.1
NetC19_2: C19.2 R13.1 R14.2 R16.1 TP11.1 | length 31.1
  Top Layer w0.4: R14.2@40.275,46.05 52.2,46.05 52.5,45.75 55.15,45.75 C19.2 ; R13.1 58.833,45.775 59.033,45.975 59.033,46.516 59.267,46.75 61.3,46.75 62.25,47.7 62.25,52.55 TP11.1
  Top Layer w0.8: C19.2 R16.1 R13.1
NetC22_2: C22.2 R12.2 R21.2 TP12.1 U5.1 | length 12.9
  Bottom Layer w0.4: U5.1 58.6,44.4 60.35,44.4 R21.2 ; R12.2@60.4,45.75 60.6,45.95 60.875,45.95 62.625,47.7 62.625,50.225 TP12.1
  Bottom Layer w0.8: R21.2 R12.2@60.4,45.75
NetC26_2: C26.2 R26.2 U6.6 | length 4.7
  Bottom Layer w0.4: C26.2@26.4,46.35 R26.2 28.325,46.15 28.969,46.15 29.69,45.429 30.671,45.429 U6.6
NetC27_1: C27.1 U7.3 | length 2.9
  Bottom Layer w0.8: U7.3 55.615,16.79 56.2,17.375 56.2,17.55 C27.1@56.25,17.55
NetC31_2: C31.2 R29.2 R32.2 U6.9 | length 21
  Top Layer w0.4: R32.2 19.784,55.05 cw(c19.784,54.65) 20.067,54.933 24.15,50.85 v1(24.15,50.8)
  Bottom Layer w0.4: v1(24.15,50.8) 26.1,50.8 29.525,47.375 U6.9
  Bottom Layer w0.8: C31.2 13.488,53.875 13.488,55.15 R29.2@13.5,55.15 ; 14.197,55.05 R32.2
NetC34_2: C34.2 D5.2 D6.1 J9.1 R35.2 U6.13 | length 54.2
  Top Layer w0.4: J9.1 16.8,75.4 16.8,61.25 v1(19.025,59.025)
  Bottom Layer w0.4: D6.1 D5.2 9.788,79.387 C34.2 9.912,79.287 9.912,80.563 R35.2 11.625,80.575 J9.1 ; v1(19.025,59.025) 19.282,58.856 cw(c19.063,58.522) 19.346,58.804 28.225,49.925 32.05,49.925 35.133,46.842 ccw(c35.416,47.125) 35.416,46.725 U6.13
NetC37_2: C37.2 D8.2 D10.1 J11.1 R43.2 U6.10 | length 60.6
  Top Layer w0.4: v1(30.05,48.8) 32.375,51.125 34,51.125 46.85,63.975 46.85,81.825 47.975,82.95 53.45,82.95 J11.1
  Bottom Layer w0.4: v1(30.05,48.8) 30.079,48.771 30.079,48.035 30.088,48.025 U6.10 ; C37.2@54.175,79.2 54.175,80.55 55.85,80.55 J11.1 57.575,80.25 58.175,79.65 58.175,79.625 58.375,79.425 58.4,79.425 D8.2 D10.1@58.4,78.1
NetC38_2: C38.2 D9.2 D11.1 J12.1 R44.2 U6.12 | length 42.4
  Bottom Layer w0.4: U6.12 37.825,47.375 45.175,54.725 45.175,77 46.025,77.85 46.05,77.85 46.25,78.05 46.25,78.075 46.263,78.088 D9.2 ; D9.2@46.25,79.4 D9.2 ; D9.2@46.325,79.4 48,79.4 C38.2@48.112,79.288 ; R44.2@47.854,80.329 R44.2@47.943,80.418 ; R44.2@47.943,80.425 R44.2@48.1,80.425 ; R44.2 48.112,80.562 R44.2@48.112,80.425 ; C38.2 C38.2@48.112,79.288 ; J12.1@50.082,80.193 J12.1 49.857,80.418 48.768,80.418 48.76,80.425 R44.2@48.112,80.425 ; C38.2@48.112,79.288 R44.2@48.112,80.425
NetC39_2: C39.2 D7.2 D12.1 J13.1 R42.2 U6.11 | length 50
  Top Layer w0.4: J13.1 19.375,78.875 19.375,62.125 27.1,54.4 v1(27.1,52.425)
  Bottom Layer w0.4: C39.2@15.8,79.275 R42.2 17.675,80.575 J13.1 17.945,80.305 19.082,80.305 D7.2@19.775,79.612 ; D7.2 20.025,79.362 20.025,78.075 D12.1 ; v1(27.1,52.425) 28.8,50.725 32.325,50.725 35.025,48.025 U6.11
NetD1_1: D1.1 R25.1 | length 10.3
  Bottom Layer w0.5: D1.1 62.025,59.53 62.025,64.65 60.625,66.05 60.625,66.275 60.475,66.425 R25.1
NetD1_2: D1.2 R22.2 TP16.1 U6.15 X3.1 | length 69.6
  Top Layer w0.4: X3.1 28.395,23.095 37.2,31.9 v3(39.1,31.9)
  Bottom Layer w0.4: U6.15 44.1,45.425 ; v3(39.1,31.9) 39.1,33.95 44.1,38.95 44.1,45.425 ; R22.2 58.5,64.075 60.225,62.35 D1.2 55.15,55.195 TP16.1 51.75,53.075 44.1,45.425
NetD2_1: D2.1 L2.1 TP18.1 U7.2 | length 23.5
  Top Layer w0.5: v3(54.972,18.06) 60.082,18.06 60.5,18.478 v3(60.5,18.525)
  Top Layer w0.8: L2.1 61.761,10.186 65.106,10.186 65.575,10.655 65.575,12.2 TP18.1@65.95,12.575
  Bottom Layer w0.5: v3(60.5,18.525) 60.5,18.5 60.975,18.025 61.6,17.4 D2.1
  Bottom Layer w0.8: U7.2 v3(54.972,18.06) ; D2.1 61.6,16.8 64.45,16.8 65.5,15.75 TP18.1
NetD3_1: D3.1 R27.2 | length 13.8
  Bottom Layer w0.4: R27.2 R27.2@43.9,50.525 ; R27.2@43.9,50.4 46.92,50.4 D3.1
NetD4_1: D4.1 R31.2 | length 2
  Bottom Layer w0.4: D4.1 13.18,57.7 R31.2
NetD13_1: D13.1 R47.1 | length 21.1
  Top Layer w0.4: D13.1 7.175,53.875 13.05,48 17,48 18.925,46.075 v1(18.925,44.575)
  Bottom Layer w0.4: R47.1@18.865,43.865 R47.1 18.913,43.912 18.913,44.563 v1(18.925,44.575)
NetJ3_3: J3.3 R7.2 | length 6.9
  Bottom Layer w0.4: J3.3 34.75,58.544 35.15,58.944 35.15,58.95 35.879,59.679 cw(c36.232,59.325) 36.232,59.825 38.243,59.825 cw(c38.243,59.325) 38.597,59.679 40.05,58.225 R7.2
NetJ3_4: J3.4 R10.2 | length 12.2
  Top Layer w0.4: v1(27.375,59.25) 28.15,60.025 35.525,60.025 J3.4
  Bottom Layer w0.4: R10.2 v1(27.375,59.25)
NetJ8_2: J8.2 U6.18 | length 9.6
  Bottom Layer w0.4: U6.18 37.675,43.475 38.008,43.808 cw(c38.291,43.525) 38.291,43.925 39.325,43.925 cw(c39.325,43.525) 39.725,43.525 39.725,41.261 cw(c39.325,41.261) 39.608,40.978 J8.2
NetJ8_3: J8.3 R30.1 U6.19 | length 8.9
  Bottom Layer w0.4: J8.3 37.14,41.05 38.375,41.05 38.75,41.425 R30.1 38.725,42.825 U6.19
NetJ8_4: J8.4 R40.1 TP26.1 U6.20 U10.4 | length 40
  Top Layer w0.4: TP26.1 10.325,45.975 v1(11.6,44.7) 11.6,42.825 12.525,41.9 21.45,41.9 26.675,36.675 30.225,36.675 J8.4
  Bottom Layer w0.4: U10.4 11.565,43.865 R40.1 v1(11.6,44.7) ; J8.4 32.25,38.7 32.25,40.275 34.15,42.175 U6.20
NetJ8_5: J8.5 R37.1 TP28.1 U6.1 U10.6 | length 36
  Top Layer w0.4: TP28.1 13.3,44.9 v1(14.1,44.9) ; v1@14.1,44.909 14.1,45.925 14.95,46.775 16.2,46.775 16.975,46 16.975,44.275 17.975,43.275 25.035,43.275 J8.5
  Bottom Layer w0.4: v1(14.1,44.9) R37.1 14.105,43.895 U10.6 ; J8.5 29.66,41.764 cw(c30.06,41.764) 30.053,42.164 30.098,42.165 U6.1
NetR3_2: R3.2 U1.5 | length 6.9
  Bottom Layer w0.5: U1.5 25.775,26.37 27.07,26.37 27.375,26.675 R3.2
NetR4_1: R4.1 R7.1 U6.16 VD1.2 | length 23.8
  Top Layer w0.4: v1(32.487,48.024) 33.938,49.475 36.425,49.475 38.8,51.85 v1(38.8,51.875)
  Bottom Layer w0.4: v1(32.487,48.024) 32.723,48.024 33.076,47.67 33.08,47.67 34.275,46.475 34.275,45.825 35.285,44.815 35.613,44.815 35.653,44.775 U6.16 ; VD1.2@34.75,55.978 VD1.2 34.822,55.95 R4.1 40.2,55.95 40.2,53.206 38.869,51.875 v1(38.8,51.875)
NetR5_1: R5.1 R10.1 U6.17 VD2.2 | length 22.5
  Top Layer w0.4: v1(28.8,55.925) 28.8,46.375 31.6,43.575 v1(33.4,43.575)
  Bottom Layer w0.4: R10.1 27.4,55.925 v1(28.8,55.925) R5.1 30.203,55.928 VD2.2 ; v1(33.4,43.575) 33.95,44.125 U6.17@35.525,44.125
NetR27_1: R27.1 U6.14 | length 8
  Bottom Layer w0.4: U6.14 40.759,46.075 ccw(c40.759,46.475) 41.042,46.192 43.05,48.2 R27.1
NetR28_2: R28.2 U7.1 U7.7 U7.8 | length 15.7
  Bottom Layer w0.8: U7.7 U7.8 58.081,19.33 58.55,18.861 R28.2
NetR31_1: R31.1 U6.3 | length 24.9
  Bottom Layer w0.4: R31.1 18.55,57.7 22.925,53.325 22.925,43.975 23.425,43.475 U6.3
NetR33_2: R33.2 R34.2 U7.5 | length 5.9
  Bottom Layer w0.4: R33.2 47,11.9 R34.2 48.675,15.445 48.6,15.52 U7.5
NetR36_1: R36.1 U9.6 X4.3 ZD1.2 ZD2.2 | length 38.2
  Top Layer w0.4: v1(7,21.119) 12.519,15.6 v1(20.8,15.6)
  Bottom Layer w0.4: R36.1 1.325,22.6 1.475,22.45 1.475,21.868 1.768,21.575 6.557,21.575 7,21.132 v1(7,21.119) 7.348,20.77 U9.6@7.348,19.248
  Bottom Layer w1: X4.3@18.468,5.031 18.468,6.638 18.1,7.006 18.1,7.7 ZD1.2@17.4,8.4 ; v1(20.8,15.6) ZD2.2 20.1,12.1 19.7,12.1 18.1,10.5 18.1,9.1 ZD1.2@17.4,8.4 ; ZD1.2@17.4,8.4 ZD1.2 ZD1.2@17.4,8.4
NetR38_1: R38.1 R41.1 TP24.1 U9.4 | length 19.8
  Top Layer w0.4: v1(9.5,24.4) 12.7,21.2 TP24.1@19.6,21.2
  Bottom Layer w0.4: R41.1 8.605,27.395 U9.4@8.605,24.385 ; U9.4 U9.4@8.605,24.385 ; R38.1 12.5,23.6 11.7,24.4 v1(9.5,24.4) 8.62,24.4 U9.4@8.605,24.385
NetR39_1: R39.1 R45.1 TP29.1 U9.1 | length 11.7
  Bottom Layer w0.4: TP29.1 1.6,27.375 2.625,26.35 2.775,26.2 R45.1 ; R45.1@2.9,26.2 R39.1 3.05,22.75 4.35,22.75 4.78,23.18 4.78,24.15 U9.1
NetR41_2: R41.2 U10.13 | length 4.7
  Bottom Layer w0.4: R41.2 10.75,27.55 10.75,27.85 11.565,28.665 U10.13
NetR45_2: R45.2 U10.11 | length 14.6
  Top Layer w0.4: v1(6.7,28.2) v1(14.1,28.2)
  Bottom Layer w0.4: R45.2 v1(6.7,28.2) ; v1(14.1,28.2) 14.105,28.205 U10.11
NetR46_2: R46.2 TP27.1 U9.2 U9.3 U10.12 | length 24.9
  Top Layer w0.4: v1(7.3,26.2) v1(12.9,26.2) TP27.1
  Bottom Layer w0.4: U9.2 U9.3 ; v1(7.3,26.2) 7.335,26.165 U9.3 ; R46.2 7.9,22.7 7.35,23.25 7.35,24.15 U9.3 ; U10.12 12.835,26.346 12.9,26.281 v1(12.9,26.2)
NetR47_2: R47.2 R48.2 TP25.1 U6.2 U10.5 | length 25.9
  Top Layer w0.4: v1(12.875,42.85) 14.025,42.85 15.575,44.4 v1(15.575,45.9)
  Bottom Layer w0.4: U10.5 12.875,40.965 v1(12.875,42.85) ; v1(15.575,45.9) R48.2 R47.2 R47.2@19.02,46.02 ; TP25.1@20.55,47.5 TP25.1 19.475,46.05 19.275,46.05 19.15,45.925 19.15,45.875 19.325,45.7 19.35,45.7 22.225,42.825 U6.2
NetR49_2: R49.2 U9.7 X4.1 ZD1.1 ZD3.2 | length 20.2
  Bottom Layer w0.4: ZD3.2@4.547,12.9 4.547,14.822 5.6,15.875 R49.2@5.6,16.125 ; R49.2 5.658,16.158 5.658,17.128 6.065,17.535 U9.7
  Bottom Layer w1: ZD3.2@4.547,12.9 7.847,9.6 10.266,9.6 ZD1.1@11.466,8.4 ; X4.1@10.725,4.608 10.725,7.659 ZD1.1@11.466,8.4 ; ZD1.1 ZD1.1@11.466,8.4
NetU1_6: U1.6 U1.7 | length 1.3
  Bottom Layer w0.5: U1.6 U1.7
VCC: C12.1 C32.1 R28.1 U7.6 X3.4 X3.5 X5.2 | length 53.6
  Top Layer w0.5: X3.4 X3.5 44.05,21.5 45.3,20.25 45.3,11.925 46.7,10.525 49.475,10.525 X5.2@55.5,4.5
  Top Layer w0.8: v1(50.775,15.2) 50.825,15.2 54.25,11.775 v1(56.25,11.775)
  Bottom Layer w0.8: U7.6 49.185,16.79 v1(50.775,15.2)
  Bottom Layer w1: C32.1 54.025,11.875 v1@56.225,11.875 ; X5.2@55.45,4.45 X5.2@55.45,4.718 ; X5.2@55.5,4.768 56.25,5.518 C12.1 56.25,11.85 v1@56.225,11.875 ; R28.1@58.25,11.875 v1@56.225,11.875
pads on no net: DD1.1 DD1.2 DD1.3 DD1.4 U10.3 U10.14
copper on no net:
  other v5: 21.85,34.625 45.05,34.65

## Polygon pours and split planes (outlines as drawn)
GND_III on Top Layer "NONET_L-01_P-001" (solid, pour order 3): 44,0 44,20 23,20 23,32.2 16.075,39.125 0,39.125 0,75 6,75 6,84 23,84 23,64 44,64 44,84 61,84 61,75 67,75 67,9 61,9 61,0
GND_2 on Top Layer "NONET_L-01_P-001" (solid, pour order 1): 5.975,0.025 5.975,9.05 0.05,9.05 0,9.1 0,34.65 4.72,34.65 5.87,35.8 15.875,35.8 20.675,31 20.675,19.15 22.95,16.875 22.95,0.05
GND_2 on Bottom Layer "NONET_L-01_P-001" (solid, pour order 0): 5.975,0.025 5.975,9.05 0.05,9.05 0,9.1 0,34.65 4.72,34.65 5.87,35.8 15.875,35.8 20.625,31.05 20.625,19.2 22.95,16.875 22.95,0.05
GND_III on Bottom Layer "NONET_L-01_P-001" (solid, pour order 2): 44,0 44,20 23,20 23,32.2 16.075,39.125 0,39.125 0,75 6,75 6,84 23,84 23,64 44,64 44,84 61,84 61,75 67,75 67,9 61,9 61,0

## Keep-outs
Keep-Out Layer:
  circle w0.2: c3,3 r1.5
  circle w0.2: c64,3 r1.5
  circle w0.2: c64,81 r1.5
  circle w0.2: c3,81 r1.5
  lines w0.2: 44,84 44,64 23,64 23,84 3,84 ccw(c3,81) 0,81 0,3 ccw(c3,3) 3,0 23,0 23,20 44,20 44,0 64,0 ccw(c64,3) 67,3 67,81 ccw(c64,81) 64,84 44.004,84

## Silkscreen, mask and mechanical layers (free items; w line width, h text height)
Top Overlay:
  circle w1: c3.002,81.003 r2
  circle w1: c64.002,81.003 r2
  circle w1: c63.98,3.005 r2
  circle w1: c3.002,3.003 r2
  lines w0.2: 0.75,48.41 0.75,35.75 3.25,35.75 ; 63.75,35.75 66.25,35.75 66.25,48.41 66.25,56.675 64.975,57.95
  text "ADC_2" at 54.804,73.887 h0.8
  text "ADC_5" at 9.829,73.837 h0.8
  text "ADC_3" at 15.754,73.787 h0.8
  text "ADC_4" at 48.954,73.787 h0.8
  text "GND" at 48.904,72.304 h0.8
  text "GND" at 9.854,72.204 h0.8
  text "GND" at 54.779,72.179 h0.8
  text "GND" at 15.754,72.154 h0.8
  text "GND" at 63.104,69.654 h0.8
  text "ADC_1" at 61.904,67.087 h0.8
  text "+5" at 63.704,64.554 h0.8
  text "N1" at 64.104,61.954 h0.8
  text "+5" at 32.571,61.504 h0.8 r90
  text "SCL" at 35.196,61.304 h0.8 r90
  text "GND" at 30.196,61.254 h0.8 r90
  text "SDA" at 37.546,61.254 h0.8 r90
  text "P1" at 64.204,59.354 h0.8
  text "RX" at 29.871,33.904 h0.8 r90
  text "TX" at 32.571,33.754 h0.8 r90
  text "GND" at 27.221,33.229 h0.8 r90
  text "3V3" at 40.371,33.229 h0.8 r90
  text "SWDIO" at 37.821,31.754 h0.8 r90
  text "SWCLK" at 35.221,31.604 h0.8 r90
  text "VCC" at 36.496,23.679 h0.8 r90
  text "GND" at 33.896,23.579 h0.8 r90
  text "VCC" at 39.096,23.554 h0.8 r90
  text "INT UI" at 28.796,23.454 h0.8 r90
  text "GND" at 31.296,23.454 h0.8 r90
  text "A" at 19.971,10.354 h1.2 r90
  text "GND" at 15.346,10.279 h1.2 r90
  text "B" at 9.796,10.204 h1.2 r90
  text "VCC" at 59.596,7.004 h1.2 r90
  text "GND" at 46.471,1.004 h1.2 r90
Bottom Overlay:
  circle w1: c3.002,81.003 r2
  circle w1: c64.002,81.003 r2
  circle w1: c64,3 r2
  circle w1: c3.002,3.003 r2

## Text inside footprints (layer, text, board x,y; h text height)
DD1: Top Overlay "SCL" at 35.136,54.879 h0.8 r90; Top Overlay "SDA" at 37.711,54.804 h0.8 r90; Top Overlay "VCC" at 32.661,54.929 h0.8 r90; Top Overlay "GND" at 29.961,54.829 h0.8 r90